# Altium PCB MiniPC.PcbDoc (part 6 of 24)
Units mm, origin at the board's own origin, x right, y up, seen from the top; angles counter-clockwise.
Board outline 175 x 155 mm, 16 copper layers (1_Top, 2_int1_(gnd), 3_int2_(power), 4_int3_(gnd), 5_int4_(sign), 6_int5_(power), 7_int6_(sign), 8_int7_(power), 9_int8_(gnd), 10_int9_(sign), 11_int10_(gnd), 12_int11_(sign), 13_int12_(gnd), 14_int13_(power), 15_int14_(gnd), 16_Bottom), stack 2.008 mm thick; 1046 components, 837 nets, 6010 pads, 4009 vias.
Unrouted connection lines stored in the file: 564.
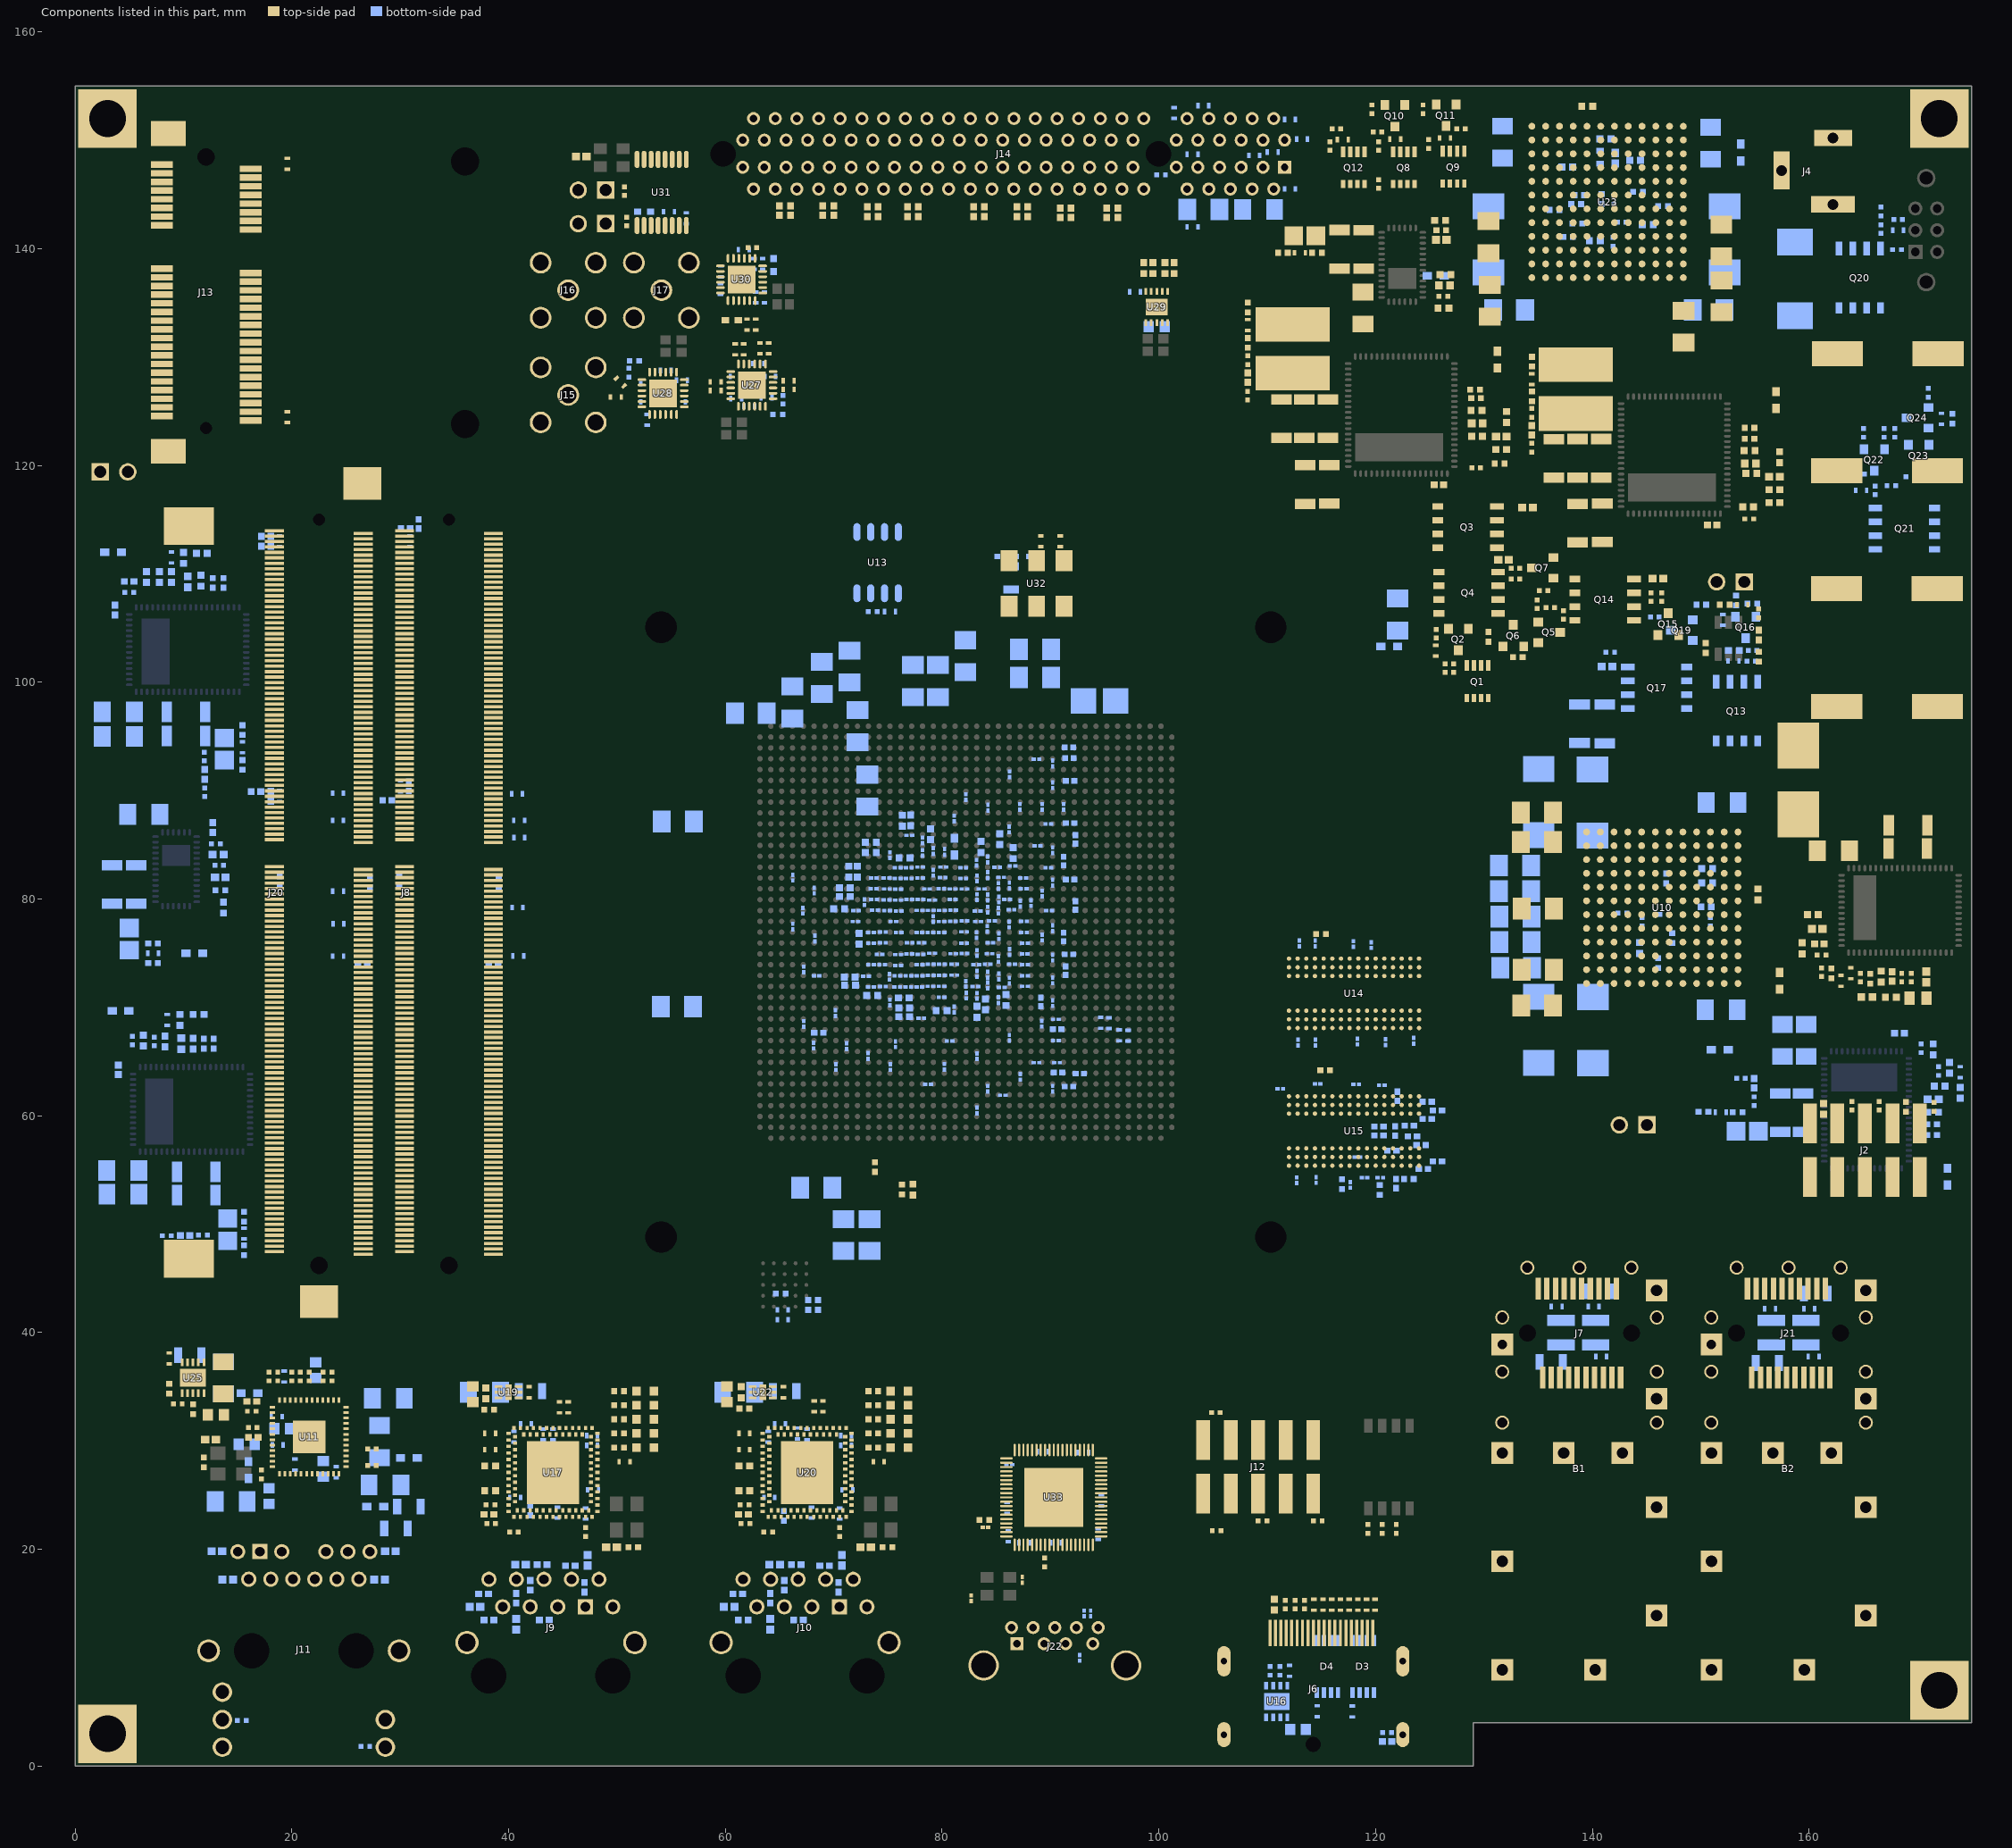
[diagram p19: the components of this part, seen from the top]

## Part data (continued)
C111: library part CMP-2008-04622-4, "Chip Capacitor, 22 nF, +/- 10%, 25 V, -55 to 125 degC, 0402 (1005 Metric), RoHS, Tape and Reel", Capacitance="22 nF", Case\/Package=0402, Case Code (Metric)=1005, Manufacturer="Basic Passives", Max Operating Temperature="125 degC", Min Operating Temperature="-55 degC", Package Quantity=10000, Tolerance=10%, Type (Capacitors)=X7R, Voltage Rating="25 V", Case Code (Imperial)=0402, ComponentLink1Description="Manufacturer URL", ComponentLink1URL=http://www.murata.com/, ComponentLink2Description=Datasheet, ComponentLink2URL=http://search.murata.co.jp/Ceramy/image/img/A01X/G101/ENG/GRM155R71E223KA61-01.pdf, DatasheetVersion=02/2016, Height="0.5 mm", Lead Pitch="2 mm", Length="1 mm", Mount="Surface Mount", Mounting Technology="Surface Mount", PackageDescription="2-Pin Surface Mount Device, Body 1 x 0.5 mm", PackageReference=0402, Packaging="Tape and Reel", PartNumber=GRM155R71E223KA61D, Pins=2, Radiation Hardening=No, RoHSCompliant=true, Voltage Rating (DC)="25 V", Width="0.5 mm"
C117: library part CMP-2008-04665-4, "Chip Capacitor, 680 pF, +/- 10%, 50 V, -55 to 125 degC, 0402 (1005 Metric), RoHS, Tape and Reel", Capacitance="680 pF", Case\/Package=0402, Case Code (Metric)=1005, Manufacturer="Basic Passives", Max Operating Temperature="125 degC", Min Operating Temperature="-55 degC", Package Quantity=10000, Tolerance=10%, Type (Capacitors)=X7R, Voltage Rating="50 V", Case Code (Imperial)=0402, ComponentLink1Description="Manufacturer URL", ComponentLink1URL=http://www.murata.com/, ComponentLink2Description=Datasheet, ComponentLink2URL=http://search.murata.co.jp/Ceramy/image/img/A01X/G101/ENG/GRM155R71H681KA01-01.pdf, DatasheetVersion=02/2016, Height="0.5 mm", Lead Pitch="2 mm", Length="1 mm", Mount="Surface Mount", Mounting Technology="Surface Mount", PackageDescription="2-Pin Surface Mount Device, Body 1 x 0.5 mm", PackageReference=0402, Packaging="Tape and Reel", PartNumber=GRM155R71H681KA01D, Pins=2, Radiation Hardening=No, RoHSCompliant=true, Voltage Rating (DC)="50 V", Width="0.5 mm"
C118 C119 C120 C121 C122 C123 C124 C125 C126 C127 C128 C129 C130 C143 C144 C145 C146 C153 C154 C155 C156 C157 C158 C159 C160 C162 C163 C164 C165 C166 C167 C168 C169 C170 C171 C172 C173 C174 C175 C176 C177 C178 C179 C180 C181 C182 C183 C184 C185 C186 C187 C188 C189 C190 C191 C192 C193 C194 C195 C196 C197 C198 C199 C200 C201 C202 C203 C204 C205 C206 C207 C208 C209 C210 C211 C212 C213 C214 C215 C216 C217 C218 C219 C220 C221 C222 C223 C224 C225 C226 C227 C228 C229 C230 C231 C232 C233 C234 C235 C236 C237 C238 C239 C240 C241 C242 C243 C244 C245 C246 C247 C248 C249 C250 C251 C252 C253 C254 C255 C256 C257 C258 C259 C260 C261 C262 C263 C264 C265 C266 C267 C268 C269 C270 C271 C272 C273 C274 C275 C276 C277 C278 C279 C280 C281 C282 C391 C392 C393 C394 C395 C396 C397 C398 C399 C400 C401 C402 C403 C404 C405 C406 C424 C425 C426 C427 C428 C429 C430 C431 C432 C433 C434 C435 C436 C437 C438 C439 C440 C441 C442 C443 C444 C445 C446 C447 C448 C449 C450 C451 C452 C453 C454 C455 C456 C457 C458 C459 C460 C461 C462 C463 C464 C465 C466 C467 C468 C469 C470 C471 C472 C473 C474 C475 C476 C477 C478 C479 C480 C560 C561 C562 C563 C564 C565 C569: library part CMP-2010-01652-4, "Chip Capacitor, 100 nF, +/- 10%, 6.3 V, -55 to 85 degC, 0201 (0603 Metric), RoHS, Tape and Reel", Capacitance="100 nF", Case\/Package=0201, Case Code (Metric)=0603, Manufacturer="Basic Passives", Max Operating Temperature="85 degC", Min Operating Temperature="-55 degC", Package Quantity=15000, Tolerance=10%, Type (Capacitors)=X5R, Voltage Rating="6.3 V", Voltage Rating (DC)="3 V", Case Code (Imperial)=0201, ComponentLink1Description="Manufacturer URL", ComponentLink1URL=http://www.murata.com/, ComponentLink2Description=Datasheet, ComponentLink2URL=http://search.murata.co.jp/Ceramy/image/img/A01X/G101/ENG/GRM033R60J104KE19-01.pdf, DatasheetVersion=03/2016, Height="0.3 mm", Length="0.6 mm", Mount="Surface Mount", Mounting Technology="Surface Mount", PackageDescription="2-Pin Surface Mount Device, Body 0.6 x 0.3 mm", PackageReference=0201, Packaging="Tape and Reel", PartNumber=GRM033R60J104KE19D, Pins=2, Radiation Hardening=No, REACH SVHC="No SVHC", RoHSCompliant=true, Width="0.3 mm"
C297 C329 C355 C368 C372 C375 C379 C382 C386 C542: library part CMP-1662-00016-2, "Chip Capacitor, 2.2 uF, +/- 10%, 10 V, -55 to 85 degC, 0603 (1608 Metric), RoHS, Tape and Reel", Capacitance="2.2 uF", Case/Package=0603, Case Code (Metric)=1608, Max Operating Temperature="85 degC", Min Operating Temperature="-55 degC", Package Quantity=10000, Tolerance=10%, Case Code (Imperial)=0603, ComponentLink1Description="Manufacturer URL", ComponentLink1URL=http://www.murata.com/, ComponentLink2Description=Datasheet, ComponentLink2URL=https://datasheet.ciiva.com/134/grm188r61a225ke34-01-134206.pdf, DatasheetVersion=01/2013, Height="0.8 mm", Length="0.063 inch", Mounting Technology="Surface Mount", PackageDescription="2-Pin Surface Mount Device, Body 1.6 x 0.8 mm", Packaging="Tape and Reel", PartNumber=GRM188R61A225KE34x, Radiation Hardening=No, RoHSCompliant=True, Width="0.031 inch"
C308: library part CMP-2008-04663-4, "Chip Capacitor, 4.7 nF, +/- 10%, 50 V, -55 to 125 degC, 0402 (1005 Metric), RoHS, Tape and Reel", Capacitance="4.7 nF", Case\/Package=0402, Case Code (Metric)=1005, Manufacturer="Basic Passives", Max Operating Temperature="125 degC", Min Operating Temperature="-55 degC", Package Quantity=1, Tolerance=10%, Type (Capacitors)=X7R, Voltage Rating="50 V", Case Code (Imperial)=0402, ComponentLink1Description="Manufacturer URL", ComponentLink1URL=http://www.murata.com/, ComponentLink2Description=Datasheet, ComponentLink2URL=http://search.murata.co.jp/Ceramy/image/img/A01X/G101/ENG/GRM155R71H472KA01-01.pdf, DatasheetVersion=02/2016, Height="0.5 mm", Lead Pitch="2 mm", Length="1 mm", Mount="Surface Mount", Mounting Technology="Surface Mount", PackageDescription="2-Pin Surface Mount Device, Body 1 x 0.5 mm", PackageReference=0402, Packaging="Cut Tape", PartNumber=GRM155R71H472KA01D, Pins=2, Radiation Hardening=No, REACH SVHC="No SVHC", RoHSCompliant=true, Voltage Rating (DC)="50 V", Width="0.5 mm"
C330 C356 C370 C376 C377 C549 C552 C554 C557 C559: library part CMP-1663-00007-1, "Chip Capacitor, 10 uF, +/- 10%, 16 V, -55 to 85 degC, 0805 (2012 Metric), RoHS, Tape and Reel", Capacitance="10 uF", Case\/Package=0805, Case Code (Metric)=2012, Max Operating Temperature="85 degC", Min Operating Temperature="-55 degC", Package Quantity=1, Tolerance=10%, Type (Capacitors)=X5R, Voltage Rating="16 V", Case Code (Imperial)=0805, ComponentLink1Description="Manufacturer URL", ComponentLink1URL=http://www.tdk.com/, ComponentLink2Description=Datasheet, ComponentLink2URL=https://product.tdk.com/info/en/catalog/datasheets/mlcc_commercial_general_en.pdf, DatasheetVersion=03/2015, Height="0.85 mm", Length="2 mm", Mount="Surface Mount", Mounting Technology="Surface Mount", PackageDescription="2-Pin Surface Mount Device, Body 2 x 1.25 mm", PackageReference=0805, Packaging="Tape and Reel", Pins=2, REACH SVHC="No SVHC", RoHSCompliant=true, Voltage Rating (DC)="16 V", Width="1.25 mm"
C390: library part CMP-1664-00002-2, "Tantalum Capacitor, 330 uF, +/- 20%, 2.5 V, -55 to 105 degC, 2-Pin Molded, RoHS, Tape and Reel", Capacitance="330 uF", Case/Package=1411, Max Operating Temperature="105 degC", Min Operating Temperature="-55 degC", Package Quantity=2000, ComponentLink1Description="Manufacturer URL", ComponentLink1URL=http://www.kemet.com/, ComponentLink2Description=Datasheet, ComponentLink2URL=http://capacitoredge.kemet.com/capedge2/DataSheet?pn=T520B337M2R5ATE045, DatasheetVersion=07/2016, Height="2.1 mm", Length="3.5 mm", Mount="Surface Mount", Mounting Technology="Surface Mount", PackageDescription="2-Pin Surface Mount Device, Body 3.5 x 2.8 mm", Packaging="Tape and Reel", PartNumber=T520B337M2R5ATE045, Radiation Hardening=No, RoHSCompliant=True, Width="2.8 mm"
C407 C408 C409 C410 C411 C412 C413 C414 C415 C416 C417 C418 C419 C420 C421 C422: library part CMP-2008-04550-4, "Chip Capacitor, 4.7 uF, +/- 20%, 6.3 V, -55 to 85 degC, 0402 (1005 Metric), RoHS, Tape and Reel", Capacitance="4.7 uF", Case\/Package=0402, Case Code (Metric)=1005, Manufacturer="Basic Passives", Max Operating Temperature="85 degC", Min Operating Temperature="-55 degC", Package Quantity=1, Tolerance=20%, Type (Capacitors)=X5R, Voltage Rating="6.3 V", Case Code (Imperial)=0402, ComponentLink1Description="Manufacturer URL", ComponentLink1URL=http://www.murata.com/, ComponentLink2Description=Datasheet, ComponentLink2URL=http://search.murata.co.jp/Ceramy/image/img/A01X/G101/ENG/GRM155R60J475ME87-01.pdf, DatasheetVersion=03/2016, Height="0.5 mm", Length="0.039 inch", Mount="Surface Mount", Mounting Technology="Surface Mount", PackageDescription="2-Pin Surface Mount Device, Body 1 x 0.5 mm", PackageReference=0402, Packaging="Tape and Reel", PartNumber=GRM155R60J475ME87D, Pins=2, Radiation Hardening=No, REACH SVHC="No SVHC", RoHSCompliant=true, Voltage Rating (DC)="6.3 V", Width="0.02 inch"
D1: library part CMP-1693-00001-1, "Surface Mount Schottky Barrier Rectifier, 5 A, 0.55 V, -55 to 150 degC, 2-Pin SMD, RoHS, Tape and Reel", Manufacturer="Diodes Inc", ComponentLink1Description="Manufacturer URL", ComponentLink1URL=http://www.diodes.com/, ComponentLink2Description=Datasheet, ComponentLink2URL=http://www.diodes.com/_files/datasheets/ds13012.pdf, DatasheetVersion="Rev. 16-2", Mounting Technology="Surface Mount", PackageDescription="2-Pin Surface Mount Device, Body 5.905 x 6.855 mm", PackageReference=SMC-2, PartNumber=B530C-13-F
D3 D4: library part CMP-1482-00002-1, "TVS Diode WE-TVS-SS, VRWM=5V", Manufacturer="Wuerth Elektronik", Reverse Stand Off Voltage=5V, ComponentLink1Description="Manufacturer URL", ComponentLink1URL=http://www.we-online.com, ComponentLink2Description=Datasheet, ComponentLink2URL=http://katalog.we-online.de/kataloge/eisos/media/pdf/82401646.pdf, PackageReference=MSOP-8L, PartNumber=82401646
D5 D6 D7 D8 D9 D10 D11 D12 D13 D14: library part CMP-1426-00006-1, "SMD mono-color Chip LED, WL-SMCW, Bright Green", Color="Bright Green", Manufacturer="Wuerth Elektronik", ComponentLink1Description="Manufacturer URL", ComponentLink1URL=http://www.we-online.com, ComponentLink2Description=Datasheet, ComponentLink2URL=http://katalog.we-online.com/led/datasheet/150060VS75000.pdf, PackageReference=0603_A, PartNumber=150060VS75000
F1: library part CMP-1700-00001-3, "154 Series OMNI-BLOK(R) Fuse and Holder Assembly, 125 VAC, 125 VDC, 1 A, -55 to 125 degC, 2-Pin SMD, RoHS", Max Operating Temperature="125 degC", Min Operating Temperature="-55 degC", ComponentLink1Description="Manufacturer URL", ComponentLink1URL=http://www.littelfuse.com/, ComponentLink2Description=Datasheet, ComponentLink2URL=http://www.littelfuse.com/~/media/electronics/datasheets/fuses/littelfuse_fuse_154_154t_154l_154tl_datasheet.pdf.pdf, DatasheetVersion="Rev. Apr-16", Mount="Surface Mount", Mounting Technology="Surface Mount", PackageDescription="2-Pin Surface Mount Device, Body 9.73 x 5.03 mm", PartNumber=154001, Pins=2, RoHSCompliant=False
J1 J3 J5 J18 J19: library part CMP-1712-00002-1, "Male Header, Pitch 2.54 mm, 1 x 2 Position, Height 8.54 mm, Tail Length 3 mm, -40 to 105 degC, RoHS, Bulk", Manufacturer="Wuerth Elektronik", ComponentLink1Description="Manufacturer URL", ComponentLink1URL=https://www.we-online.com/, ComponentLink2Description=Datasheet, ComponentLink2URL=http://katalog.we-online.de/em/datasheet/6130xx11121.pdf, DatasheetVersion="Rev. J", Mounting Technology="Through Hole", PackageDescription="Male Header, Pitch 2.54 mm, 1 x 2 Position, Height 8.54 mm, Tail Length 3 mm", PackageReference=61300211121, PartNumber="613 002 111 21"
J2: library part CMP-1707-00003-1, "Male Header, Pitch 2.54 mm, 2 x 5 Position, Height 9.65 mm, -55 to 105 degC, RoHS, Tape and Reel", Manufacturer=Samtec, ComponentLink1Description="Manufacturer URL", ComponentLink1URL=http://www.samtec.com/, ComponentLink2Description=Datasheet, ComponentLink2URL=http://suddendocs.samtec.com/catalog_english/tsm.pdf, ComponentLink3Description="Package Specification", ComponentLink3URL=http://suddendocs.samtec.com/prints/tsm-dv-footprint.pdf, DatasheetVersion="Rev. 31DEC15", Mounting Technology="Surface Mount", PackageDescription="Male Header, Pitch 2.54 mm, 2 x 5 Position, Height 9.65 mm", PackageReference=TSM-105-01-T-DV, PartNumber=TSM-105-01-T-DV-TR
J4: library part CMP-1737-00001-1, "DC Power Jack, Female, -10 to 70 degC, 3-Pin THD, RoHS", Current Rating="1 A", Max Operating Temperature="70 degC", Min Operating Temperature="-10 degC", Package Quantity=100, Voltage Rating="16 V", ComponentLink1Description="Manufacturer URL", ComponentLink1URL=http://kobiconn.industrialpartner.com/, ComponentLink2Description=Datasheet, ComponentLink2URL=https://datasheet.ciiva.com/12342/kc-300037-195479-12342832.pdf, Connector Type=Power, DatasheetVersion=05/2009, Gender=Female, Mounting Technology="Through Hole", PackageDescription="3-Pin Through Hole Device, Body 8.9916 x 13.4874 mm", PartNumber=16PJ032, RoHSCompliant=false
J6: library part CMP-1704-00002-1, "DisplayPort Connector, Pitch 0.5 mm, 1 x 20 Position, Height 6.65 mm, -20 to 85 degC, RoHS, Tape and Reel", Manufacturer=Molex, ComponentLink1Description="Manufacturer URL", ComponentLink1URL=http://www.molex.com/, ComponentLink2Description=Datasheet, ComponentLink2URL=http://www.molex.com/pdm_docs/sd/472720024_sd.pdf, DatasheetVersion="Rev. F", Mounting Technology="Surface Mount", PackageDescription="DisplayPort Connector, Pitch 0.5 mm, 1 x 20 Position, Height 6.65 mm", PackageReference=472720024, PartNumber=472720024
J7 J21: library part CMP-1707-00001-1, "Female Transceiver Interface, Pitch 0.8 mm, 2 x 10 Position, Height 5.2 mm, -55 to 125 degC, RoHS, Tube", Manufacturer=Samtec, ComponentLink1Description="Manufacturer URL", ComponentLink1URL=http://www.samtec.com/, ComponentLink2Description=Datasheet, ComponentLink2URL=http://suddendocs.samtec.com/catalog_english/mect.pdf, ComponentLink3Description="Package Specification", ComponentLink3URL=http://suddendocs.samtec.com/prints/mect-1xx-xx-xx-xx-d-rax-xx-footprint.pdf, DatasheetVersion="Rev. Feb-16", Mounting Technology="Surface Mount", PackageDescription="Female Transceiver Interface, Pitch 0.8 mm, 2 x 10 Position, Height 5.2 mm", PackageReference=MECT-110-01-M-D-RA1, PackageVersion="Rev. H, 06/2016", PartNumber=MECT-110-01-M-D-RA1
J8: library part CMP-1735-00002-1, "Surface Mount Horizontal Type DDR4 DIMM Socket Connector, 260 Position, Pitch 0.5 mm, -55 to 85 degC, Halogen/Lead Free, Tape and Reel", ComponentLink1Description="Manufacturer URL", ComponentLink1URL=http://www.foxconn.com/, ComponentLink2Description="Surface Mount", ComponentLink2URL=https://drive.google.com/drive/folders/0By4GUdJb-DJ9Um5lRWw4YjB4d2c, DatasheetVersion="Rev. A, 10/2013", Mounting Technology="Surface Mount", PackageDescription="260-Pin Surface Mount Device, Body Length 73.1 mm, Pitch 0.5 mm", PartNumber=AS0A823-H8SB-7H, System=Connector
J9 J10: library part CMP-1710-00001-3, "RJ45 LAN Transformer, Modular JACK, 0 to 70 degC, 10-Pin THD, RoHS, Tube", ComponentLink1Description="Manufacturer URL", ComponentLink1URL=https://www.we-online.com/, ComponentLink2Description=Datasheet, ComponentLink2URL=https://katalog.we-online.de/pbs/datasheet/7499111001A.pdf, DatasheetVersion="Rev. 01", Mounting Technology="Through Hole", PackageDescription="10-Pin Through Hole Device, Body 21.84 x 16 mm", PartNumber=7499111001A, RoHSCompliant=False
J11: library part CMP-1715-00001-1, "Gigabit MagJack(R) Ultra Low Profile, 10/100/1000 Base-T, 19-Pin THD, RoHS, Tray", Case/Package=Metal, Package Quantity=60, ComponentLink1Description="Manufacturer URL", ComponentLink1URL=http://belfuse.com/ethernet/, ComponentLink2Description=Datasheet, ComponentLink2URL=http://belfuse.com/pdfs/L829-1J1T-43.pdf, DatasheetVersion="Rev. G", Height="11.3 mm", Length="17.78 mm", Mount="Through Hole", Mounting Technology="Through Hole", PackageDescription="19-Pin Through Hole Device, Body 23.94 x 17.58 mm, Pitch 2.03 mm", Packaging=Tray, PartNumber=L829-1J1T-43, Pins=8, RoHSCompliant=True, Width="24.13 mm"
J12: library part CMP-1707-00003-3, "Male Header, Pitch 2.54 mm, 2 x 5 Position, Height 9.65 mm, -55 to 105 degC, RoHS, Tape and Reel", Max Operating Temperature="105 degC", Min Operating Temperature="-55 degC", ComponentLink1Description="Manufacturer URL", ComponentLink1URL=http://www.samtec.com/, ComponentLink2Description=Datasheet, ComponentLink2URL=http://suddendocs.samtec.com/catalog_english/tsm.pdf, ComponentLink3Description="Package Specification", ComponentLink3URL=http://suddendocs.samtec.com/prints/tsm-dv-footprint.pdf, DatasheetVersion="Rev. 31DEC15", Height="9.65 mm", Length="12.7 mm", Mount="Surface Mount", Mounting Technology="Surface Mount", PackageDescription="Male Header, Pitch 2.54 mm, 2 x 5 Position, Height 9.65 mm", Packaging="Tape and Reel", PartNumber=TSM-105-01-T-DV-TR, Pins=10, Radiation Hardening=No, REACH SVHC="No SVHC", RoHSCompliant=True
J13: library part CMP-0001-00120-2, "Board-to-Board Connector, SMT, Right Angle, Pitch 0.8mm, 52-Position, Female", Package Reference=BTB-SM0-8-2H52F, ClassName="Board Template Connector", Datasheet Version=Oct-2006, Mating Connector=PCIeMini-CN-2S-M-R52, Publisher=Altium, System=Connector
J14: library part CMP-1707-00002-1, "Female Header, Pitch 1 mm, 98 Positions, 4 Rows, Height 11 mm, Tail Length 2.31 mm, -55 to 125 degC, RoHS", Manufacturer=Samtec, ComponentLink1Description="Manufacturer URL", ComponentLink1URL=http://www.samtec.com/, ComponentLink2Description=Datasheet, ComponentLink2URL=http://suddendocs.samtec.com/catalog_english/pcie.pdf, ComponentLink3Description="Package Specification", ComponentLink3URL=http://suddendocs.samtec.com/prints/pcie-xxx-02-x-d-th-footprint.pdf, DatasheetVersion="Rev. 21JAN16", Mounting Technology="Through Hole", PackageDescription="Female Header, Pitch 1 mm, 98 Positions, 4 Rows, Height 11 mm, Tail Length 2.31 mm", PackageReference=PCIE-098-02-F-D-TH, PartNumber=PCIE-098-02-F-D-TH
J15 J16 J17: library part CMP-1713-00001-1, "SMA Connector, Pitch 2.54 mm, 1 Position, Height 9.5 mm, Tail Length 4 mm, RoHS", Manufacturer="Lighthorse Technologies Inc.", ComponentLink1Description="Manufacturer URL", ComponentLink1URL=http://www.rfconnector.com, ComponentLink2Description=Datasheet, ComponentLink2URL=http://rfconnector.com/sheets/SASF54GT.pdf, DatasheetVersion="Rev. May-99", Mounting Technology="Through Hole", PackageDescription="SMA Connector, Pitch 2.54 mm, 1 Position, Height 9.5 mm, Tail Length 4 mm", PackageReference=LTI-SASF54GT, PartNumber=LTI-SASF54GT
J20: library part CMP-1735-00001-2, "Surface Mount Horizontal Type DDR4 DIMM Socket Connector, 260 Position, Pitch 0.5 mm, -55 to 85 degC, Halogen/Lead Free, Tape and Reel", ComponentLink1Description="Manufacturer URL", ComponentLink1URL=http://www.foxconn.com/, ComponentLink2Description=Datasheet, ComponentLink2URL=https://drive.google.com/drive/folders/0By4GUdJb-DJ9Um5lRWw4YjB4d2c, DatasheetVersion="Rev. A, 10/2013", Mounting Technology="Surface Mount", PackageDescription="260-Pin Surface Mount Device, Body Length 73.1 mm, Pitch 0.5 mm", PartNumber=AS0A823-H4SB-7H, System=Connector
J22: library part CMP-1698-00002-1, "USB 3.0 Standard-A Receptacle Right Angle Type Soldering to Board Termination, 30 V, -55 to 85 degC, 9-Pin THD, RoHS, Tray", ComponentLink1Description="Manufacturer URL", ComponentLink1URL=http://portal.fciconnect.com/, ComponentLink2Description=Datasheet, ComponentLink2URL=http://portal.fciconnect.com/Comergent/fci/documentation/gs-12-0928.pdf, ComponentLink3Description="Package Specification", ComponentLink3URL=http://portal.fciconnect.com/Comergent/fci/drawing/10117835.pdf, DatasheetVersion="Rev. B, 05/2014", Mounting Technology="Through Hole", PackageDescription="9-Pin Through Hole Device, Body 15.6 x 16.5 mm", PackageReference=10117835
L1 L2 L3 L4 L5 L6 L7 L8 L9 L10 L11 L12 L13 L14 L15 L16: library part CMP-0220-00193-1, "SMD EMI Suppression Ferrite Bead WE-CBF, Z = 30 Ohm", ComponentLink1Description="Manufacturer Link", ComponentLink1URL=http://www.we-online.com, ComponentLink2Description=Datasheet, ComponentLink2URL=http://www.we-online.de/katalog/media/pdf/742792609.pdf, DatasheetVersion=Dec-2005, Impedance="30 Ohm", PackageDescription="Chip Inductor, 2-Leads, Body 1.6 x 0.8 mm", PackageReference=SMD-0603, PackageVersion=2009
L17: library part CMP-0686-00186-2, "Chip Ferrite Bead for General Use, 220 Ohm, 450 mA, -55 to 125 degC, 1 x 0.5 x 0.55 mm SMD, Tape and Reel", DC Resistance="0.29 Ohm Max.", Manufacturer=Murata, Operating Temperature Range="-55 to 125 degC", Rated Current="450 mA", ComponentLink1Description="Manufacturer URL", ComponentLink1URL=http://www.murata.com/, ComponentLink2Description=Datasheet, ComponentLink2URL=http://www.murata.com/products/catalog/pdf/c31e.pdf, ComponentLink3Description="Package Specification", ComponentLink3URL=http://www.murata.com/products/catalog/pdf/c31e.pdf, DatasheetVersion=08/2013, Impedance (at 100 MHz)="220 Ohm +/- 25%", Mounting Technology="Surface Mount", PackageDescription="2-Pin Chip, Body 1 x 0.5 mm", PackageReference=BLM15-2, Packing="Tape and Reel", PartNumber=BLM15AG221SN1J
L18 L22: library part CMP-1662-00018-3, "Chip Bead, 220 Ohm, +/- 25 %, 100 MHz, 300 mA, -55 to 125 degC, 0402 (1005 Metric), RoHS", Case/Package=0402, Case Code (Metric)=1005, Current Rating="200 mA", Max Current Rating="450 mA", Max Operating Temperature="125 degC", Min Operating Temperature="-55 degC", Package Quantity=10000, Resistance="220 Ohm", Tolerance=25%, Case Code (Imperial)=0402, ComponentLink1Description="Manufacturer URL", ComponentLink1URL=http://www.murata.com/, ComponentLink2Description=Datasheet, ComponentLink2URL=https://datasheet.ciiva.com/11800/0900766b811b5866-11800858.pdf, DatasheetVersion=03/2011, Height="0.5 mm", Length="1 mm", Mounting Technology="Surface Mount", PackageDescription="2-Pin Surface Mount Device, Body 1 x 0.5 mm", PartNumber=BLM15AG221SN1x, Radiation Hardening=No, REACH SVHC="No SVHC", RoHSCompliant=True, Width="0.5 mm"
L19 L20 L21: library part CMP-0220-00137-1, "SMD EMI Suppression Ferrite Bead WE-CBF, Z = 220 Ohm", ComponentLink1Description="Manufacturer Link", ComponentLink1URL=http://www.we-online.com, ComponentLink2Description=Datasheet, ComponentLink2URL=http://www.we-online.de/katalog/media/pdf/742792780.pdf, DatasheetVersion="ver 4, Jul-2009", Impedance="220 Ohm", PackageDescription="Chip Inductor, 2-Leads, Body 1.0 x 0.5 mm", PackageReference=SMD-0402, PackageVersion=2009
L23 L24 L25 L26: library part CMP-1716-00001-2, "Chip Inductor, 1000 nH, +/- 1%, -40 to 125 degC, 2-Pin SMD, RoHS, Tape and Reel", Inductance="1000 nH", ComponentLink1Description="Manufacturer URL", ComponentLink1URL=http://www.coilcraft.com/, ComponentLink2Description=Datasheet, ComponentLink2URL=http://datasheet.octopart.com/1008CS-102XFLC-Coilcraft-datasheet-10791557.pdf, DatasheetVersion=01/2012, Mounting Technology="Surface Mount", PackageDescription="2-Pin Surface Mount Device, Body 2.92 x 2.79 mm", PartNumber=1008CS-102XFLC, RoHSCompliant=False
Q1 Q8 Q9 Q12: library part CMP-1709-00001-3, "P-Channel MOSFET, 20 V, -50 to 150 degC, 8-Pin SMD (PPAK1212-8S), RoHS, Tape and Reel", ComponentLink1Description="Manufacturer URL", ComponentLink1URL=http://www.vishay.com/, ComponentLink2Description=Datasheet, ComponentLink2URL=http://www.vishay.com/docs/62852/siss23dn.pdf, ComponentLink3Description="Package Specification", ComponentLink3URL=http://www.vishay.com/docs/63919/caseoutl.pdf, DatasheetVersion="Rev. A", Mounting Technology="Surface Mount", PackageDescription="8-Pin Surface Mount Device, Body 3.3 x 3.3 mm, Pitch 0.66 mm", PackageVersion="Rev. A, 03/2012", PartNumber=SiSS23DN-T1-GE3
Q2 Q10 Q11: library part CMP-1693-00002-1, "P-Channel Enhancement Mode MOSFET, 20 V, -55 to 150 degC, 3-Pin SOT23, RoHS, Tape and Reel", Manufacturer="Diodes Inc", ComponentLink1Description="Manufacturer URL", ComponentLink1URL=http://www.diodes.com/, ComponentLink2Description=Datasheet, ComponentLink2URL=http://www.diodes.com/_files/datasheets/DMG2305UX.pdf, DatasheetVersion="Rev. 5-2", Mounting Technology="Surface Mount", PackageDescription="3-Pin Small Outline Transistor, Body 2.9 x 1.3 mm, Pitch 0.915 mm", PackageReference=SOT23-3, PartNumber=DMG2305UX-7
Q3 Q4 Q14 Q17: library part CMP-1709-00004-3, "N-Channe MOSFET, 30 V, -55 to 150 degC, 8-Pin SMD (PPAKSO-8), RoHS, Tape and Reel", Case/Package=SOIC, Max Operating Temperature="150 degC", Min Operating Temperature="-55 degC", Package Quantity=1, ComponentLink1Description="Manufacturer URL", ComponentLink1URL=http://www.vishay.com/, ComponentLink2Description=Datasheet, ComponentLink2URL=http://www.vishay.com/docs/63780/sira00dp.pdf, DatasheetVersion="Rev. B", Height="1.07 mm", Length="5.99 mm", Mount="Surface Mount", Mounting Technology="Surface Mount", PackageDescription="8-Pin Surface Mount Device, Body 4.9 x 5.89 mm, Pitch 1.27 mm", Packaging="Tape and Reel", PartNumber=SiRA00DP-T1-GE3, Pins=8, Radiation Hardening=No, REACH SVHC=Unknown, RoHSCompliant=True, Width="5 mm"
Q5 Q6 Q7 Q15 Q16 Q19 Q23 Q24: library part CMP-1693-00003-1, "NPN Small Signal Transistor, 40 V, -55 to 150 degC, 3-Pin SOT23, RoHS, Tape and Reel", Manufacturer="Diodes Inc", ComponentLink1Description="Manufacturer URL", ComponentLink1URL=http://www.diodes.com/, ComponentLink2Description=Datasheet, ComponentLink2URL=http://www.diodes.com/_files/datasheets/ds30041.pdf, DatasheetVersion="Rev. 16 - 2", Mounting Technology="Surface Mount", PackageDescription="3-Pin Small Outline Transistor, Body 2.9 x 1.3 mm, Pitch 0.95 mm", PackageReference=SOT23-3, PartNumber=MMBT2222A-7-F
Q13 Q20 Q21: library part CMP-1709-00003-3, "P-Channel MOSFET, 20 V, -55 to 150 degC, 8-Pin SMD (PPAKSO-8), RoHS, Tape and Reel", ComponentLink1Description="Manufacturer URL", ComponentLink1URL=http://www.vishay.com/, ComponentLink2Description=Datasheet, ComponentLink2URL=http://www.vishay.com/docs/65021/si7635dp.pdf, DatasheetVersion="Rev. B", Mounting Technology="Surface Mount", PackageDescription="8-Pin Surface Mount Device, Body 4.9 x 5.89 mm, Pitch 1.27 mm", PartNumber=Si7635DP-T1-GE3
Q22: library part CMP-0697-00001-2, "P-Channel Enhancement Mode MOSFET, -30 V VDS, -55 to 155 degC, 3-Pin SOT23, RoHS, Tape and Reel", Manufacturer="Diodes Inc", Operating Temperature Range="-55 to 150 degC", ComponentLink1Description="Manufacturer URL", ComponentLink1URL=http://www.diodes.com/, ComponentLink2Description=Datasheet, ComponentLink2URL=http://www.diodes.com/datasheets/ds31447.pdf, ComponentLink3Description="Package Specification", ComponentLink3URL=http://www.diodes.com/datasheets/ap02002.pdf, DatasheetVersion="Rev. 8 - 2", IDS (TA="25 degC)=-3.8 A", Mounting Technology="Surface Mount", PackageDescription="3-Pin Small Outline Transistor, Body 1.3 x 2.9 mm, Pitch 0.95 mm", PackageReference=SOT23, PackageVersion="Rev. 75", Packing="Tape and Reel", PartNumber=DMP3098L-7, PD (TA="25 degC)=1.08 W", RDS(on) (Max.) (VGS="4.5 V)=120 mOhm", RoHS=TRUE, VDS="-30 V", VGS="+/- 20 V", VGS(th) (Max.)="-2.1 V"
R1 R2 R12 R13 R14 R15 R19 R114 R128 R130 R135 R136: library part CMP-2002-00622-3, "Chip Resistor, 10 Ohm, +/- 1%, 100 mW, -55 to 155 degC, 0402 (1005 Metric), RoHS, Tape and Reel", Case\/Package=0402, Case Code (Metric)=1005, Manufacturer="Basic Passives", Max Operating Temperature="155 degC", Min Operating Temperature="-55 degC", Package Quantity=10000, Power Rating="100 mW", Resistance="10 Ohm", Tolerance=1%, Voltage Rating="50 V", Case Code (Imperial)=0402, ComponentLink1Description="Manufacturer URL", ComponentLink1URL=http://www.panasonic.com/, ComponentLink2Description=Datasheet, ComponentLink2URL=http://industrial.panasonic.com/cdbs/www-data/pdf/RDA0000/AOA0000C86.pdf, DatasheetVersion=04/2015, Height="0.35 mm", Length="1 mm", Mount="Surface Mount", Mounting Technology="Surface Mount", PackageDescription="2-Pin Surface Mount Device, Body 1 x 0.5 mm", PackageReference=0402, Packaging="Tape and Reel", PartNumber=ERJ-2RKF10R0X, Pins=2, Radiation Hardening=No, REACH SVHC=Yes, RoHSCompliant=true, Width="0.5 mm"
R3 R129 R132 R133 R134 R179: library part CMP-2002-00967-3, "Chip Resistor, 49.9 KOhm, +/- 1%, 100 mW, -55 to 155 degC, 0402 (1005 Metric), RoHS, Tape and Reel", Case\/Package=0402, Case Code (Metric)=1005, Manufacturer="Basic Passives", Max Operating Temperature="155 degC", Min Operating Temperature="-55 degC", Package Quantity=10000, Power Rating="100 mW", Resistance="49.9 KOhm", Tolerance=1%, Voltage Rating="50 V", Case Code (Imperial)=0402, ComponentLink1Description="Manufacturer URL", ComponentLink1URL=http://www.panasonic.com/, ComponentLink2Description=Datasheet, ComponentLink2URL=http://industrial.panasonic.com/cdbs/www-data/pdf/RDA0000/AOA0000C86.pdf, DatasheetVersion=04/2015, Height="0.35 mm", Length="1 mm", Mount="Surface Mount", Mounting Technology="Surface Mount", PackageDescription="2-Pin Surface Mount Device, Body 1 x 0.5 mm", PackageReference=0402, Packaging="Tape and Reel", PartNumber=ERJ-2RKF4992X, Pins=2, Radiation Hardening=No, REACH SVHC="No SVHC", RoHSCompliant=true, Width="0.5 mm"